# Altium PCB MonitorPCB-v1.1.PcbDoc (part 1 of 2)
Units mm, origin at the board's own origin, x right, y up, seen from the top; angles counter-clockwise.
Board outline 144.83 x 35 mm, 2 copper layers (Top Layer, Bottom Layer), stack 1.57 mm thick; 68 components, 45 nets, 203 pads, 57 vias.
Unrouted connection lines stored in the file: 41.
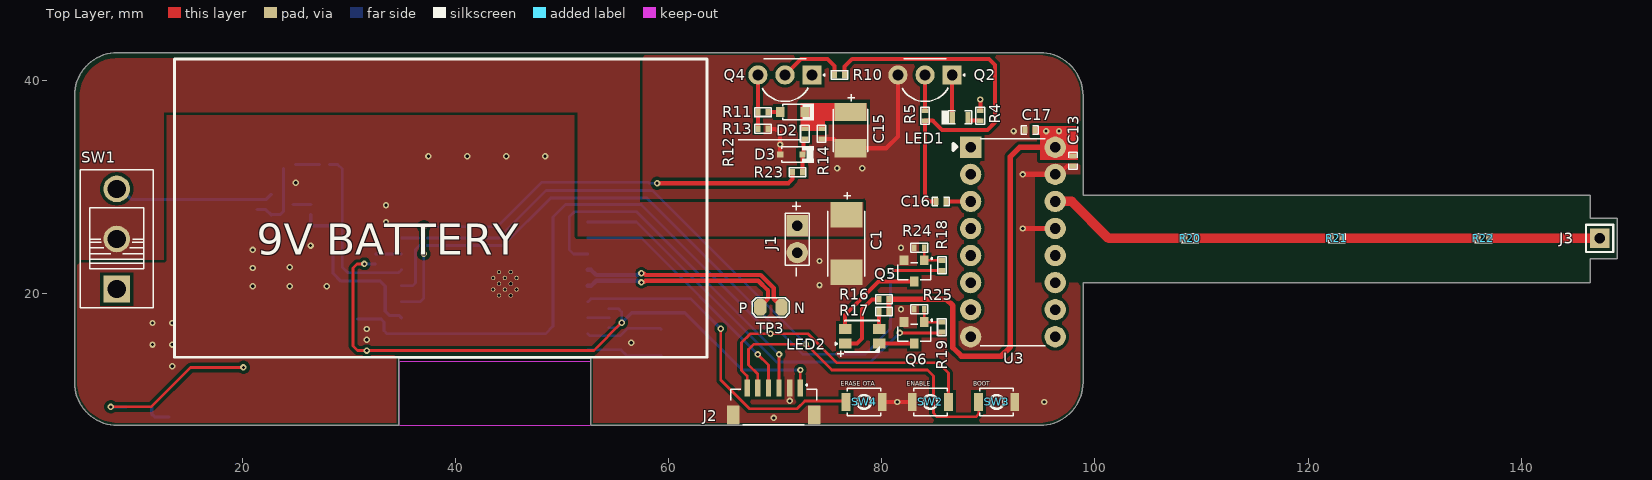
[diagram p0: Top Layer view]
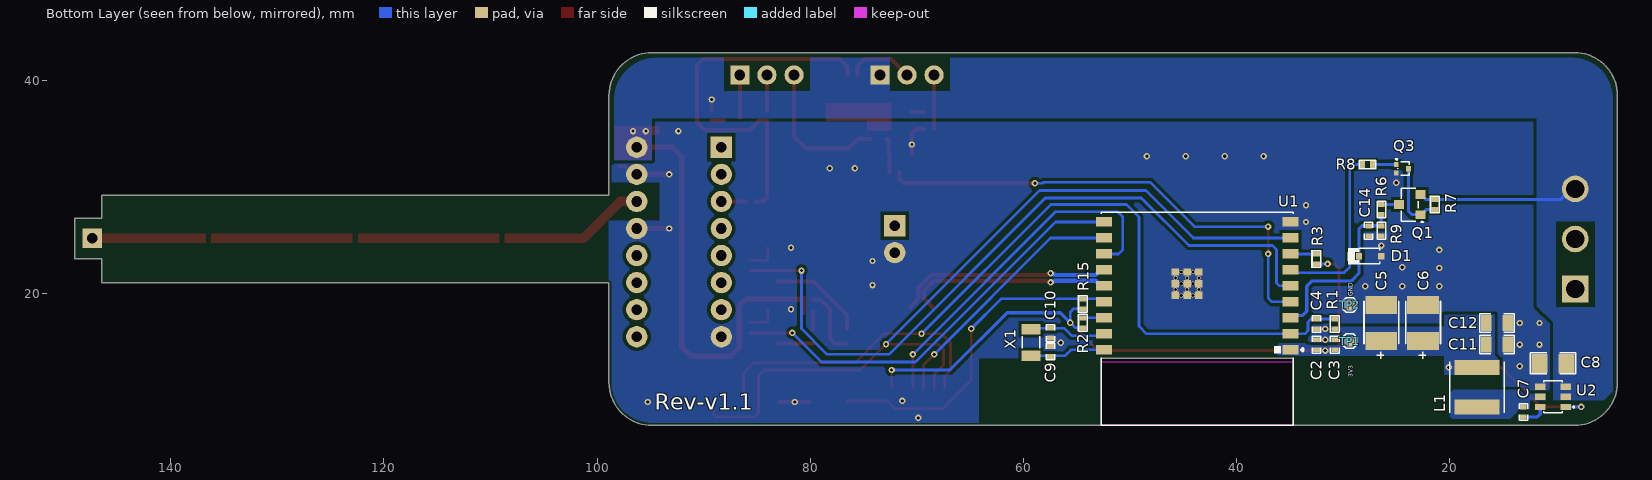
[diagram p1: Bottom Layer view, seen from below]
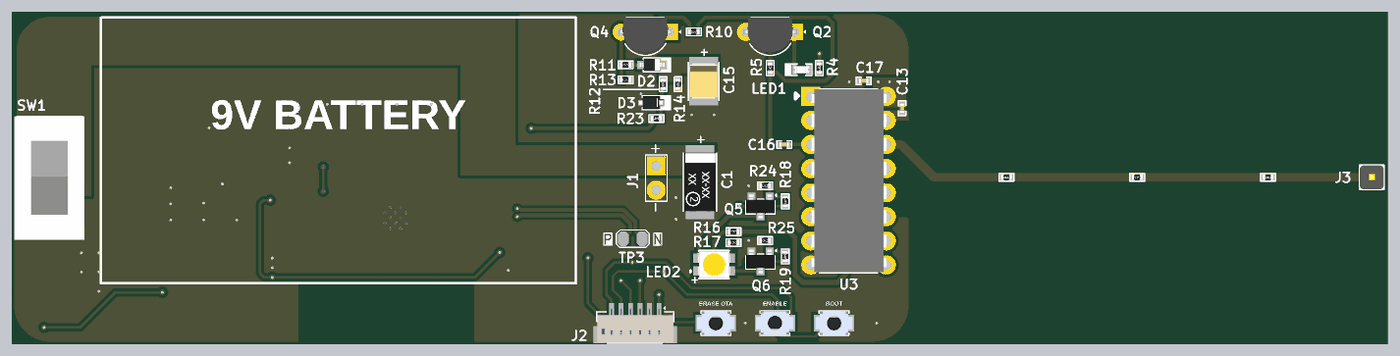
[diagram p2: 3D render of the assembled board from above, using the file's embedded part models]
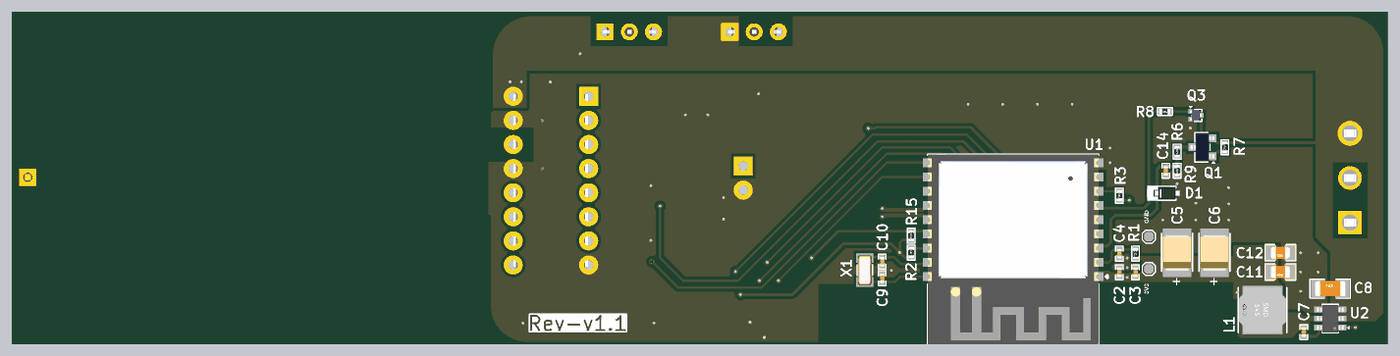
[diagram p3: 3D render of the assembled board from below, using the file's embedded part models]

## Layer stack, top to bottom
Top Solder: solder mask 0.01, Solder Resist, Dk 3.5
Top Layer: signal copper 0.035
Dielectric 1: core 1.5, FR-4, Dk 4.8
Bottom Layer: signal copper 0.035
Bottom Solder: solder mask 0.01, Solder Resist, Dk 3.5

## Board outline
8.255,7.653 34.65,7.653 34.65,13.979 52.652,13.979 52.652,7.653 94.844,7.653 ccw(c94.844,11.692) 98.882,11.692 98.882,21.027 146.507,21.027 146.507,23.313 149.047,23.313 149.047,27.123 146.507,27.123 146.507,29.282 98.882,29.282 98.882,38.617 ccw(c94.844,38.617) 94.844,42.655 8.255,42.655 ccw(c8.255,38.617) 4.216,38.617 4.216,11.692 ccw(c8.255,11.692)

## Design rules (kind name [scope] priority, off if disabled: settings)
BoardOutlineClearance [All] p1: gap=0 ignorepadtopadclearanceinfootprint=FALSE except(0.254: Poly-OutlineEdge)
Clearance Diff90R [InDifferentialPair('USB_D')] p1: gap=0.254 ignorepadtopadclearanceinfootprint=FALSE except(0.127: Arc-Arc Arc-Track Track-Track)
Clearance [All] p2: gap=0.254 ignorepadtopadclearanceinfootprint=FALSE except(0.305: Arc-Poly Track-Poly SMDPad-Poly THPad-Poly Via-Poly Fill-Poly Poly-Poly)
DiffPairsRouting [InDifferentialPair('USB_D')] p1: maxlimit=0.127 minlimit=0.127 mostfreqgap=0.127 toplayer_minwidth=0.406 toplayer_maxwidth=0.406 toplayer_prefwidth=0.406 bottomlayer_minwidth=0.406 bottomlayer_maxwidth=0.406 bottomlayer_prefwidth=0.406 impedanceprofiledriven=TRUE impedanceprofileid={3F4489F9-FEF9-4E2F-9548-F417FF496E16} impedanceprofilevalue=90.000000 maxuncoupledlength=12.7
HoleToHoleClearance [All] p1: gap=0 allowstackedmicrovias=TRUE
MinimumSolderMaskSliver [All] p1: minsoldermaskwidth=0
PolygonConnect [All] p1: connectstyle=Direct reliefconductorwidth=0.254 reliefentries=4 polygonreliefangle="90 Angle" airgapwidth=0.254
RoutingVias [All] p1: holewidth=0.3 width=0.6 viastyle="Through Hole" minholewidth=0.3 minwidth=0.6 maxholewidth=0.3 maxwidth=0.6
SilkToSilkClearance [All] p1: silktosilkclearance=0
SilkToSolderMaskClearance [IsPad] p1: minsilkscreentomaskgap=0 clearancetoexposedcopper=TRUE
SolderMaskExpansion Via [IsVia] p1: expansion=0.102 istentingtop=TRUE
Width [All] p1: maxlimit=0.9 minlimit=0.254 preferedwidth=0.254 minimp=50.000000 maximp=50.000000 favimp=50.000000
25 further rules are at their usual default settings.

## Classes and differential pairs
net class USB_LINES: USB_D_N USB_D_P
differential pair USB_D: +USB_D_P -USB_D_N

## Components (designator, comment, footprint, x,y, rotation, side; value= is the part's Value field where it differs from the comment)
C1 "68uF" Case-C 76.657,24.724 r270 top
C2 "100nF" cap-0402 32.461,15.225 r270 bottom
C3 "10uF" Cap-0402 30.759,15.225 r270 bottom
C4 "1uF" Cap-0402 32.461,17.175 r90 bottom
C5 "100uF" Case-B 26.387,17.262 r90 bottom
C6 "100uF" Case-B 22.45,17.262 r90 bottom
C7 "100nF" cap-0402 13.049,8.918 r270 bottom
C8 "10uF" Cap-1206 10.262,13.487 r180 bottom
C9 "15pF" Cap-0402 57.429,14.594 r270 bottom
C10 "15pF" Cap-0402 57.429,16.319 r90 bottom
C11 "22uF" Cap-0805 15.513,15.24 r0 bottom
C12 "22uF" Cap-0805 15.513,17.272 r0 bottom
C13 "100nF" cap-0402 97.942,32.491 r90 top
C14 "100nF" cap-0402 27.572,25.921 r90 bottom
C15 "33uF" Case-B 77.053,35.373 r270 top
C16 "100nF" cap-0402 85.534,28.681 r180 top
C17 "100nF" cap-0402 93.891,35.39 r0 top
D1 "MM3Z3V3B" SOD323F 27.428,23.546 r0 bottom
D2 "1N4148WS-7-F" SOD-323 71.624,37.073 r180 top
D3 "MM3Z3V3B" SOD323F 71.494,33.085 r0 top
J1 "BE-13-010" BE-13-010 72.06,25.142 r270 top
J2 "Voltlink Target" "Voltlink Target" 69.85,9.896 r180 top locked
J3 "DNP" "HDR 1x1 TH Male" 147.38,25.218 r0 top locked
L1 "3.9uH" SWPA5020S3R9NT 17.393,11.238 r90 bottom
LED1 "Emerald" LED-0603 87.341,36.562 r180 top
LED2 "A-SC6302R6AGHC-A03-2T" A-SC6302R6AGHC-A03-2T 78.151,16.027 r180 top
Q1 "AO3407" SOT-23 23.711,28.384 r90 bottom
Q2 "BC547BTA" TO-92-3L 84.051,40.552 r180 top locked
Q3 "MMBT3904M" SOT-723 24.413,31.754 r270 bottom
Q4 "BC547BTA" TO-92-3L 70.906,40.552 r180 top locked
Q5 "AO3400A" sot-23 83.033,22.153 r180 top
Q6 "AO3400A" sot-23 83.033,16.352 r180 top
R1 "10K" Res-0402 30.759,17.175 r270 bottom
R2 "10K" Res-0402 54.381,17.285 r270 bottom
R3 "10K" Res-0402 32.461,23.285 r270 bottom
R4 "2.2K" Res-0402 89.24,36.728 r90 top
R5 "1K" Res-0402 84.051,36.728 r90 top
R6 "47K" Res-0402 26.378,27.915 r90 bottom
R7 "1K" Res-0402 21.349,28.384 r270 bottom
R8 "4.7K" Res-0402 27.67,32.154 r180 bottom
R9 "18K" Res-0402 26.378,25.921 r90 bottom
R10 "DNP" Res-0402 76.023,40.552 r180 top
R11 "0R" Res-0402 68.836,37.073 r0 top
R12 "100K" Res-0402 72.774,35.028 r270 top
R13 "100K" Res-0402 68.836,35.498 r180 top
R14 "100K" Res-0402 74.346,35.028 r90 top
R15 "10K" Res-0402 54.381,19.063 r270 bottom
R16 "2.2K" Res-0402 80.2,19.492 r180 top
R17 "2.2K" Res-0402 80.2,18.339 r180 top
R18 "680R" Res-0402 85.649,22.683 r90 top
R19 "680R" Res-0402 85.637,16.883 r270 top
R20 "0R" Res-0402 108.928,25.218 r0 top locked
R21 "0R" Res-0402 122.695,25.218 r180 top locked
R22 "0R" Res-0402 136.462,25.218 r0 top locked
R23 "DNP" Res-0402 72.074,31.42 r180 top
R24 "10K" Res-0402 83.513,24.333 r0 top
R25 "10K" Res-0402 83.513,18.563 r0 top
SW1 "SS-12D10L9" SS-12D10L9 8.179,25.154 r90 top locked
SW2 "B3U-1000P" B3U-1000P 84.557,9.856 r180 top locked
SW3 "B3U-1000P" B3U-1000P 90.78,9.856 r0 top locked
SW4 "B3U-1000P" B3U-1000P 78.334,9.856 r0 top locked
TP1 "TEST POINT 0.5mm Dia" "Test-point - 0.5mm" 29.358,15.562 r0 bottom
TP2 "TEST POINT 0.5mm Dia" "Test-point - 0.5mm" 29.358,18.962 r0 bottom
TP3 "2 Test Pad" "2 Test Pad" 70.58,18.745 r180 top
U1 "ESP32-C3-WROOM-02-N4" ESP32-C3-WROOM-02-N4 34.9,14.755 r0 bottom
U2 "AP63203WU-7" TSOT-23-6 10.262,10.338 r0 bottom
U3 "CD4017BE(LX)" DIP-16 92.304,24.871 r0 top locked
X1 "Q13FC13500004" SMD3215-2P 59.258,15.443 r90 bottom

## Footprints (in the part's own frame and the unit in brackets; to place one, negate y for a bottom-side part, rotate by r counter-clockwise, add the part's x,y. Pads: shape width x height; smd on the part's side, far side on the other; paste and mask are expansions set on the pad)
"2 Test Pad" [mil]
  oct 45x60 smd: 1(0,0) 2(78.74,0)
  silkscreen extent -29,-36 108,36
A-SC6302R6AGHC-A03-2T [mm]
  rect 1.2x0.95 smd paste+0 mask+0.05: 1(1.6,0.675) 2(1.6,-0.675) 3(-1.6,-0.675) 4(-1.6,0.675)
  silkscreen extent -1.63,-1.48 2.51,1.93, body extent -1.75,-1.4 1.75,1.4, height 1.85
B3U-1000P [mm] "SWITCH TACTILE SPST-NO 0.05A 12V"
  rect 0.82x1.72 smd: 1(-1.7,0) 2(1.7,0)
  silkscreen extent -1.57,-1.3 1.57,1.3, body extent -2,-1.26 2,1.24, height 1.6
BE-13-010 [mm]
  rect 2x2 hole 1: 1(-1.27,0)
  round 2 hole 1: 2(1.27,0)
  silkscreen extent -3.49,-1.14 3.47,1.14
cap-0402 [mil]
  rect 18x25 smd mask+2.36: 1(-18.5,0) 2(18.5,0)
  silkscreen extent -31,-16 31,16, body extent -20,-10 20,10, height 19
Cap-0402 [mil]
  rect 18x25 smd mask+2.36: 1(-18.5,0) 2(18.5,0)
  silkscreen extent -31,-16 31,16, body extent -20,-10 20,10, height 19
Cap-0805 [mil] "SMD 0805"
  rect 40x60 smd mask+2.76: 1(-40,0) 2(40,0)
  silkscreen extent -64,-34 64,34, body extent -39,-25 39,25, height 30
Cap-1206 [mil] "SMD 1206"
  rect 60x70 smd: 1(-50,0) 2(50,0)
  silkscreen extent -84,-39 84,39, body extent -63,-31 63,32, height 39
Case-B [mm]
  rect 1.7x3 smd paste+0: 1(-1.7,0) 2(1.7,0)
  silkscreen extent -3.35,-1.63 2.03,1.63, body extent -1.85,-1.5 1.85,1.5, height 2.16
Case-C [mm]
  rect 2.4x3 smd: 1(-2.7,0) 2(2.7,0)
  silkscreen extent -4.8,-1.75 3.05,1.75, body extent -3.1,-1.67 3.1,1.68, height 2.46
DIP-16 [mm]
  rect 2x2 hole 1: 1(-3.97,8.89)
  round 2 hole 1: 2(-3.97,6.35) 3(-3.97,3.81) 4(-3.97,1.27) 5(-3.97,-1.27) 6(-3.97,-3.81) 7(-3.97,-6.35) 8(-3.97,-8.89) 9(3.97,-8.89) 10(3.97,-6.35) 11(3.97,-3.81) 12(3.97,-1.27) 13(3.97,1.27) 14(3.97,3.81) 15(3.97,6.35) 16(3.97,8.89)
  silkscreen extent -5.6,-9.73 3.05,9.68, body extent -3.91,-9.65 3.99,9.65, height 5.08
ESP32-C3-WROOM-02-N4 [mm]
  rect 1.5x0.9 smd: 1(0,0) 2(0,-1.5) 3(0,-3) 4(0,-4.5) 5(0,-6) 6(0,-7.5) 7(0,-9) 8(0,-10.5) 9(0,-12) 10(17.5,-12) 11(17.5,-10.5) 12(17.5,-9) 13(17.5,-7.5) 14(17.5,-6) 15(17.5,-4.5) 16(17.5,-3) 17(17.5,-1.5) 18(17.5,0)
  rect 0.7x0.7 smd: 19(8.61,-5.1) 20(9.71,-5.1) 21(10.81,-5.1) 22(8.61,-6.2) 23(9.71,-6.2) 24(10.81,-6.2) 25(8.61,-7.3) 26(9.71,-7.3) 27(10.81,-7.3)
  round 0.4 hole 0.3 mask+0: 28(9.16,-5.1) 29(10.26,-5.1) 30(8.61,-5.65) 31(9.71,-5.65) 32(10.81,-5.65) 33(9.16,-6.2) 34(10.26,-6.2) 35(8.61,-6.75) 36(9.71,-6.75) 37(10.81,-6.75) 38(9.16,-7.3) 39(10.26,-7.3)
  Keep-Out Layer region: 17.75,1.1 -0.25,1.1 -0.25,7.1 17.75,7.1
  silkscreen extent -1.17,-12.9 17.75,7.1, body extent -0.25,-12.9 17.75,7.1, height 3.35
"HDR 1x1 TH Male" [mm]
  rect 1.8x1.8 hole 1: 1(0,0)
  silkscreen extent -1.27,-1.27 1.27,1.27, body extent -1.27,-1.27 1.28,1.27, height 8.5
LED-0603 [mm]
  rect 0.5x1 smd: 1(-0.75,0) 2(0.75,0)
  silkscreen extent -1.12,-0.66 1.75,0.66, body extent -0.82,-0.37 0.82,0.36, height 0.68
Res-0402 [mil]
  rect 18x25 smd mask+2.17: 1(-18.5,0) 2(18.5,0)
  silkscreen extent -32,-17 32,16, body extent -23,-11 23,11, height 16
SMD3215-2P [mm]
  rect 1x1.8 smd: 1(-1.25,0) 2(1.25,0)
  silkscreen extent -0.56,-0.81 0.56,0.81, body extent -1.6,-0.75 1.6,0.75, height 0.8
SOD323F [mm]
  rect 0.6x0.6 smd: 1(-1.05,0) 2(1.05,0)
  silkscreen extent -0.91,-0.79 2.11,0.79, body extent -1.25,-0.67 1.25,0.68, height 1
SOD-323 [mm]
  rect 0.8x0.9 smd mask+0.055: 1(-1.15,0) 2(1.15,0)
  silkscreen extent -2.01,-0.79 0.94,0.79, body extent -1.3,-0.67 1.3,0.67, height 1.1
SOT-23 [mm] "TRANS NPN 40V 0.6A SOT23"
  rect 0.82x0.92 smd: 1(-0.95,-1) 2(0.95,-1) 3(0,1)
  silkscreen extent -1.68,-1.3 1.55,0.81, body extent -1.5,-1.25 1.5,1.25, height 1.05
sot-23 [mm] "TRANS NPN 40V 0.6A SOT23"
  rect 0.82x0.92 smd: 1(-0.95,-1) 2(0.95,-1) 3(0,1)
  silkscreen extent -1.68,-1.3 1.55,0.81, body extent -1.5,-1.25 1.5,1.25, height 1.05
SOT-723 [mm]
  rect 0.5x0.45 smd: 1(-0.4,-0.575) 2(0.4,-0.575) 3(0,0.575)
  silkscreen extent -0.94,-0.66 0.64,0.64, body extent -0.6,-0.6 0.6,0.6, height 0.5
SS-12D10L9 [mm]
  rect 2.5x2.5 hole 1.7 paste-2539.97 mask+0.051: 1(-4.7,0)
  round 2.5 hole 1.7 paste-2539.97 mask+0.051: 2(0,0) 3(4.7,0)
  silkscreen extent -6.48,-3.43 6.48,3.43, body extent -6.5,-3.7 6.5,3.7, height 16
SWPA5020S3R9NT [mm]
  rect 1.4x4.2 smd: 1(-1.85,0) 2(1.85,0)
  silkscreen extent -2.4,-2.55 2.38,2.55, body extent -2.51,-2.5 2.51,2.5, height 2.12
"Test-point - 0.5mm" [mm]
  oct 1x1 smd: 1(0,0)
  silkscreen extent -0.68,-0.68 0.68,0.68
TO-92-3L [mm]
  rect 1.8x1.8 hole 1 paste-2539.97 mask+0.051: 1(-2.54,0)
  round 1.8 hole 1 paste-2539.97 mask+0.051: 2(0,0) 3(2.54,0)
  silkscreen extent -3.71,-1.5 2.14,2.48, body extent -2.77,-1.5 2.77,2.2, height 7.79
TSOT-23-6 [mm]
  rect 1x0.6 smd: 1(-1.2,0.95) 2(-1.2,0) 3(-1.2,-0.95) 4(1.2,-0.95) 5(1.2,0) 6(1.2,0.95)
  silkscreen extent -1.98,-1.5 0.86,1.5, body extent -1.41,-1.45 1.41,1.45, height 1
"Voltlink Target" [mm]
  rect 0.5x1.6 smd: 1(-2.5,-1.262) 2(-1.5,-1.262) 3(-0.5,-1.262) 4(0.5,-1.262) 5(1.5,-1.262) 6(2.5,-1.262)
  rect 1.2x1.8 smd: MP1(-3.8,1.262) MP2(3.8,1.262)
  silkscreen extent -4.06,-1.68 4.06,2.17, body extent -4,-1.49 4,2.11, height 4.25

## Part data
C1: library part TAJC686K016RNJ, "CAP TANT 68UF 10% 16V 2312", Case Code (Imperial)=2312, Case Code (Metric)=6032, Case/Package=Molded, Dielectric Material=Tantalum, ESR (Equivalent Series Resistance)=1.3R, LCSC Part Number=C7220, Leakage Current=10.9uA, Manufacturer="Kyocera AVX", Max Operating Temperature=125°C, Min Operating Temperature=-55°C, Package Quantity=1, Tolerance=10%, Voltage=16V, Voltage Rating (DC)=16.3V, ComponentLink1Description=https://datasheet.ciiva.com/11794/0900766b802e69d0-11794413.pdf?src-supplier=Rs, ComponentLink1URL=https://datasheet.ciiva.com/11794/0900766b802e69d0-11794413.pdf?src-supplier=Rs, ComponentLink2Description=https://datasheet.ciiva.com/7864/1680476-7864538.pdf?src-supplier=Element14, ComponentLink2URL=https://datasheet.ciiva.com/7864/1680476-7864538.pdf?src-supplier=Element14, ComponentLink3Description=https://datasheet.ciiva.com/7864/1680476-7864539.pdf?src-supplier=Element14, ComponentLink3URL=https://datasheet.ciiva.com/7864/1680476-7864539.pdf?src-supplier=Element14, ComponentLink4Description=https://datasheet.ciiva.com/7864/1680476-7864537.pdf?src-supplier=Element14, ComponentLink4URL=https://datasheet.ciiva.com/7864/1680476-7864537.pdf?src-supplier=Element14, ComponentLink5Description=https://datasheet.ciiva.com/28577/taj-28577855.pdf?src-supplier=Element14, ComponentLink5URL=https://datasheet.ciiva.com/28577/taj-28577855.pdf?src-supplier=Element14, ComponentLink6Description=https://datasheet.ciiva.com/264/taj-264443.pdf?src-supplier=Digikey, ComponentLink6URL=https://datasheet.ciiva.com/264/taj-264443.pdf?src-supplier=Digikey, ComponentLink7Description=https://datasheet.ciiva.com/264/taj-264442.pdf?src-supplier=Digikey, ComponentLink7URL=https://datasheet.ciiva.com/264/taj-264442.pdf?src-supplier=Digikey, ComponentLink8Description=https://datasheet.ciiva.com/264/taj-264444.pdf?src-supplier=Digikey, ComponentLink8URL=https://datasheet.ciiva.com/264/taj-264444.pdf?src-supplier=Digikey, ComponentLink9Description=https://datasheet.ciiva.com/12883/taj-27497-12883640.pdf?src-supplier=Mouser, ComponentLink9URL=https://datasheet.ciiva.com/12883/taj-27497-12883640.pdf?src-supplier=Mouser, ComponentLink10Description=https://datasheet.ciiva.com/11225/taj-11225965.pdf?src-supplier=Avnet, ComponentLink10URL=https://datasheet.ciiva.com/11225/taj-11225965.pdf?src-supplier=Avnet, ComponentLink11Description=https://datasheet.ciiva.com/16298/taj-16298458.pdf?src-supplier=Future+Electronics, ComponentLink11URL=https://datasheet.ciiva.com/16298/taj-16298458.pdf?src-supplier=Future+Electronics, ComponentLink12Description=https://datasheet.ciiva.com/15163/getdatasheetpartid-41779-15163003.pdf?src-supplier=Verical, ComponentLink12URL=https://datasheet.ciiva.com/15163/getdatasheetpartid-41779-15163003.pdf?src-supplier=Verical, Depth=3.2mm, Dissipation Factor=6%, Features="General Purpose", Height=2.6mm, Height - Seated (Max)=0.11inch, Item Type=Capacitors, Lead Free="Lead Free", Length=6mm, Manufacturer Part Number=TAJC686K016RNJ, Mounting Technology="Surface Mount", Packaging="Tape and Reel", Pins=2, Polarity=Polar, Pricing="1=1.06, 10=0.729, 50=0.581, 100=0.5317 (USD)", Radiation Hardening=No, Reach SVHC Compliant=No, RoHS=Yes, RoHS Compliant=Yes, Series=TAJ, Stock=888, Supplier=Digikey, Termination=SMD/SMT, Voltage Rating=16V, Width=3.2mm
C2 C7 C13 C14 C16 C17: library part C1005X7R1H104KT000F, "CAP CER 0.1UF 50V X7R 0402", Dielectric=X7R, LCSC Part Number=C361198, Manufacturer=TDK, Tolerance=10%, Voltage=25V, Category="Ceramic Capacitors", ComponentLink1Description=LCSC, ComponentLink1URL=https://www.lcsc.com/product-detail/Multilayer-Ceramic-Capacitors-MLCC-SMD-SMT_TDK-C1005X7R1H104KT000F_C361198.html, Item Type=Capacitor, Manufacturer Part Number=C1005X7R1H104KT000F, RoHS=No, Supplier 1=Avnet, Supplier Part Number 1=C1005X7R1H104KT000F
C3: library part CC0402MRX5R6BB106, "CAP CER 10UF 10V X5R 0402", Case Code (Imperial)=0402, Case Code (Metric)=1005, LCSC Part Number=C962143, Manufacturer=Yageo, Max Operating Temperature=85°C, Min Operating Temperature=-55°C, Supplier Part Number 1=6097631, Tolerance=20%, Voltage Rating=10V, Capacitance=10uF, Case/Package=0402, Category="Ceramic Capacitors", ComponentLink1Description=http://www.yageo.com/documents/recent/UPY-GPHC_X5R_4V-to-50V_25.pdf?src-supplier=Digi-Key, ComponentLink1URL=http://www.yageo.com/documents/recent/UPY-GPHC_X5R_4V-to-50V_25.pdf?src-supplier=Digi-Key, Item Type=Capacitor, Manufacturer Part Number=CC0402MRX5R6BB106, Mount="Surface Mount", Packaging="Tape and Reel", Pricing 1="10000=0.02650, 20000=0.02590, 30000=0.02550, 40000=0.02530, 50000=0.02450 (USD)", RoHS=Yes, RoHS Compliant=Yes, Stock 1=80000, Supplier 1="Future Electronics"
C4: library part CC0402KRX5R7BB105, "CAP CER 1UF 16V X5R 0402", Case Code (Imperial)=0402, Case Code (Metric)=1005, Dielectric=X5R, LCSC Part Number=C325464, Manufacturer=Yageo, Max Operating Temperature=85°C, Min Operating Temperature=-55°C, Supplier Part Number 1=311-1691-6-ND, Tolerance=10%, Voltage Rating=16V, Capacitance=1uF, Case/Package=0402, ComponentLink1Description=http://www.yageo.com/documents/recent/UPY-GPHC_X5R_4V-to-50V_12.pdf?src-supplier=Avnet+Europe, ComponentLink1URL=http://www.yageo.com/documents/recent/UPY-GPHC_X5R_4V-to-50V_12.pdf?src-supplier=Avnet+Europe, Composition=Ceramic, Depth=0.5mm, Halogen Free="Halogen Free", Height=0.5mm, Item Type=Capacitor, Lead Free="Lead Free", Length=1mm, Manufacturer Part Number=CC0402KRX5R7BB105, Mount="Surface Mount", Packaging="Tape and Reel", Pricing 1="1=0.36, 10=0.252, 100=0.1512, 500=0.1134, 1000=0.09576, 2500=0.09072, 5000=0.08568 (USD)", Radiation Hardening=No, Stock 1=1405667, Supplier 1=Digi-Key, Termination=SMD/SMT, Thickness=0.022inch, Voltage Rating (DC)=16V, Weight=2.3E-05oz, Width=0.02inch
C5 C6: library part TPSB107M006R0250, "CAP TANT 100UF 20% 6.3V 1411", LCSC Part Number=C283239, Manufacturer="Kyocera AVX", ComponentLink1Description=https://datasheet.ciiva.com/16501/tps-16501597.pdf?src-supplier=Future+Electronics, ComponentLink1URL=https://datasheet.ciiva.com/16501/tps-16501597.pdf?src-supplier=Future+Electronics, ComponentLink2Description=https://datasheet.ciiva.com/3004/tps-3004598.pdf?src-supplier=Avnet, ComponentLink2URL=https://datasheet.ciiva.com/3004/tps-3004598.pdf?src-supplier=Avnet, ComponentLink3Description=https://datasheet.ciiva.com/264/tps-264115.pdf?src-supplier=Digikey, ComponentLink3URL=https://datasheet.ciiva.com/264/tps-264115.pdf?src-supplier=Digikey, ComponentLink4Description=https://datasheet.ciiva.com/264/tps-264116.pdf?src-supplier=Digikey, ComponentLink4URL=https://datasheet.ciiva.com/264/tps-264116.pdf?src-supplier=Digikey, ComponentLink5Description=https://datasheet.ciiva.com/264/tps-264117.pdf?src-supplier=Digikey, ComponentLink5URL=https://datasheet.ciiva.com/264/tps-264117.pdf?src-supplier=Digikey, Item Type="Tantalum Capacitors", Manufacturer Part Number=TPSB107M006R0250, Pricing="1=0.8, 10=0.504, 50=0.3874, 100=0.3515, 500=0.29072, 1000=0.27195 (USD)", RoHS=Yes, Stock=19045, Supplier=Digikey
C8: library part CC1206KKX7R7BB106, "CAP CER 10UF 16V X7R 1206", LCSC Part Number=C109464, Manufacturer=Yageo, ComponentLink1Description=https://datasheet.ciiva.com/46392/1489800-46392365.pdf?src-supplier=Element14, ComponentLink1URL=https://datasheet.ciiva.com/46392/1489800-46392365.pdf?src-supplier=Element14, ComponentLink2Description=https://datasheet.ciiva.com/11466/upy-gphc-x7r-6-3v-to-50v-8-11466571.pdf?src-supplier=Avnet, ComponentLink2URL=https://datasheet.ciiva.com/11466/upy-gphc-x7r-6-3v-to-50v-8-11466571.pdf?src-supplier=Avnet, Halogen Free=5694HalogenFree, Item Type=Capacitors, Lead Free=5697LeadFree, Manufacturer Part Number=CC1206KKX7R7BB106, Pricing="2000=0.192, 4000=0.188, 6000=0.186, 8000=0.184, 10000=0.179 (USD)", RoHS=Yes, Stock=104000, Supplier="Future Electronics"
C9 C10: library part CQ0402GRNPO9BN150, "CAP CER 15PF 50V C0G/NPO 0402", Case Code (Imperial)=0402, Case Code (Metric)=1005, Dielectric=C0G, LCSC Part Number=C577406, Manufacturer=Yageo, Max Operating Temperature=125°C, Min Operating Temperature=-55°C, Package Quantity=10000, Tolerance=2%, Voltage Rating=50V, Case/Package=0402, ComponentLink1Description=http://www.mouser.com/ds/2/447/UPY-High%20Q_NP0_16V-to-250V_11-533944.pdf?src-supplier=Mouser, ComponentLink1URL=http://www.mouser.com/ds/2/447/UPY-High%20Q_NP0_16V-to-250V_11-533944.pdf?src-supplier=Mouser, ComponentLink2Description=http://www.yageo.com/documents/recent/UPY-High%20Q_NP0_16V-to-250V_13.pdf?src-supplier=Digikey, ComponentLink2URL=http://www.yageo.com/documents/recent/UPY-High%20Q_NP0_16V-to-250V_13.pdf?src-supplier=Digikey, Item Type=Capacitors, Manufacturer Part Number=CQ0402GRNPO9BN150, Mounting Technology="Surface Mount", Packaging="Tape and Reel", Pricing="10000=0.04366 (USD)", RoHS=Yes, Series=CQ, Supplier=Digikey, Voltage Rating (DC)=50V, Weight=2.3E-05oz
C11 C12: library part GRM21BZ70J226ME44L, "CAP CER 22UF 6.3V X7R 0805", Case/Package=339Case, LCSC Part Number=C1517827, Manufacturer=Murata, Max Operating Temperature=125°C, Min Operating Temperature=-55°C, Tolerance=20%, Voltage Rating=6.3V, Height=1.45mm, Item Type=Capacitors, Length=2mm, Manufacturer Part Number=GRM21BZ70J226ME44L, Material=4241ConductorMaterial, Pricing="1=0.41, 10=0.243, 50=0.243, 100=0.154, 1000=0.108, 10000=0.082 (USD)", RoHS=Yes, RoHS Compliant=Yes, Stock=88243, Supplier=Mouser, Thickness=1.25mm, Width=1.25mm
C15: library part TAJB336K010RNJ, "CAP TANT 33UF 10% 10V 1411", Case Code (Imperial)=1210, Case Code (Metric)=3528, Dielectric Material=Tantalum, ESR (Equivalent Series Resistance)=1.8R, LCSC Part Number=C7202, Leakage Current=3.3uA, Manufacturer="Kyocera AVX", Max Operating Temperature=125°C, Min Operating Temperature=-55°C, Package Quantity=1, Supplier Part Number 1=1364604P, Tolerance=10%, Voltage=10V, Case/Package=1210, Category="Tantalum Capacitors", ComponentLink1Description=https://datasheet.ciiva.com/26341/559435-da-01-en-tacc-b-3-2-mm-x-2-5-mm-x-1-9-mm-33-uf-26341776.pdf?src-supplier=Conrad, ComponentLink1URL=https://datasheet.ciiva.com/26341/559435-da-01-en-tacc-b-3-2-mm-x-2-5-mm-x-1-9-mm-33-uf-26341776.pdf?src-supplier=Conrad, ComponentLink2Description=https://datasheet.ciiva.com/7775/49917-7775706.pdf?src-supplier=Element14, ComponentLink2URL=https://datasheet.ciiva.com/7775/49917-7775706.pdf?src-supplier=Element14, ComponentLink3Description=https://datasheet.ciiva.com/7775/49917-7775705.pdf?src-supplier=Element14, ComponentLink3URL=https://datasheet.ciiva.com/7775/49917-7775705.pdf?src-supplier=Element14, ComponentLink4Description=https://datasheet.ciiva.com/7775/1680476-7775704.pdf?src-supplier=Element14, ComponentLink4URL=https://datasheet.ciiva.com/7775/1680476-7775704.pdf?src-supplier=Element14, ComponentLink5Description=https://datasheet.ciiva.com/264/taj-264134.pdf?src-supplier=Digi-Key, ComponentLink5URL=https://datasheet.ciiva.com/264/taj-264134.pdf?src-supplier=Digi-Key, ComponentLink6Description=https://datasheet.ciiva.com/264/taj-264133.pdf?src-supplier=Digi-Key, ComponentLink6URL=https://datasheet.ciiva.com/264/taj-264133.pdf?src-supplier=Digi-Key, ComponentLink7Description=https://datasheet.ciiva.com/264/taj-264135.pdf?src-supplier=Digi-Key, ComponentLink7URL=https://datasheet.ciiva.com/264/taj-264135.pdf?src-supplier=Digi-Key, ComponentLink8Description=https://datasheet.ciiva.com/12884/taj-27497-12884279.pdf?src-supplier=Mouser, ComponentLink8URL=https://datasheet.ciiva.com/12884/taj-27497-12884279.pdf?src-supplier=Mouser, ComponentLink9Description=https://datasheet.ciiva.com/14590/70001050-14590215.pdf?src-supplier=Allied+Electronics, ComponentLink9URL=https://datasheet.ciiva.com/14590/70001050-14590215.pdf?src-supplier=Allied+Electronics, ComponentLink10Description=https://datasheet.ciiva.com/14592/70001050-14592670.pdf?src-supplier=Allied+Electronics, ComponentLink10URL=https://datasheet.ciiva.com/14592/70001050-14592670.pdf?src-supplier=Allied+Electronics, ComponentLink11Description=https://datasheet.ciiva.com/11224/taj-11224937.pdf?src-supplier=Avnet, ComponentLink11URL=https://datasheet.ciiva.com/11224/taj-11224937.pdf?src-supplier=Avnet, ComponentLink12Description=https://datasheet.ciiva.com/16492/taj-16492863.pdf?src-supplier=Future+Electronics, ComponentLink12URL=https://datasheet.ciiva.com/16492/taj-16492863.pdf?src-supplier=Future+Electronics, ComponentLink13Description=https://datasheet.ciiva.com/11224/taj-11224941.pdf?src-supplier=Avnet, ComponentLink13URL=https://datasheet.ciiva.com/11224/taj-11224941.pdf?src-supplier=Avnet, Construction=Flat, Depth=2.8mm, Dissipation Factor=6%, Features="General Purpose", Height=1.9mm, Height - Seated (Max)=0.083inch, Item Type=Capacitor, Lead Free="Lead Free", Lead Pitch=1.4mm, Length=3.5mm, Manufacturer Part Number=TAJB336K010RNJ, Mounting Technology="Surface Mount,PCB", Packaging="Tape and Reel", Pins=2, Polarity=Polar, Pricing 1="100=0.01410, 400=0.24800, 1000=0.21600 (GBP)", Radiation Hardening=No, Reach SVHC Compliant=Yes, RoHS=Yes, RoHS Compliant=Yes, Series=TAJ, Stock 1=1580, Supplier 1=Rs, Termination=SMD/SMT, Voltage Rating=10V, Voltage Rating (DC)=10V, Width=2.8mm
D1 D3: "DIODE ZENER 3.3V 200MW SOD323F", Forward Voltage=1V, LCSC Part Number=C2978865, Manufacturer="ON Semiconductor / Fairchild", Max Operating Temperature=150°C, Max Power Dissipation=200mW, Max Reverse Leakage Current=4.5uA, Min Operating Temperature=-65°C, Package Quantity=1, Supplier Part Number 1=MM3Z3V3BCT-ND, Test Current=5mA, Tolerance=2%, Working Voltage=3.3V, ComponentLink1Description=http://www.onsemi.com/pub/Collateral/MM3Z9V1B-D.pdf?src-supplier=Digi-Key, ComponentLink1URL=http://www.onsemi.com/pub/Collateral/MM3Z9V1B-D.pdf?src-supplier=Digi-Key, ComponentLink2Description=http://www.mouser.com/ds/2/149/MM3Z3V3B-187166.pdf?src-supplier=Mouser, ComponentLink2URL=http://www.mouser.com/ds/2/149/MM3Z3V3B-187166.pdf?src-supplier=Mouser, ComponentLink3Description=https://www.fairchildsemi.com/datasheets/MM/MM3Z9V1B.pdf?src-supplier=Avnet, ComponentLink3URL=https://www.fairchildsemi.com/datasheets/MM/MM3Z9V1B.pdf?src-supplier=Avnet, ComponentLink4Description=http://www.farnell.com/datasheets/1706525.pdf?src-supplier=Element14, ComponentLink4URL=http://www.farnell.com/datasheets/1706525.pdf?src-supplier=Element14, Element Configuration=Single, Height=1mm, Impedance=89R, Item Type=Diode, Lead Free="Lead Free", Length=1.3mm, Manufacturer Part Number=MM3Z3V3B, Mount="Surface Mount", Number of Pins=2, Packaging="Tape and Reel", Peak Reverse Current=4.5uA, Power Dissipation=200mW, Pricing 1="1=0.22, 10=0.18, 100=0.0956, 500=0.06288, 1000=0.04276 (USD)", Radiation Hardening=No, REACH SVHC="No SVHC", Stock 1=473644, Supplier 1=Digi-Key, Voltage Tolerance=2%, Weight=0.0276g, Width=1.7mm, Zener Voltage=3.3V
D2: "DIODE GEN PURP 75V 150MA SOD323", Average Rectified Current=150mA, Capacitance=2pF, Forward Current=300mA, Forward Voltage=1.25V, LCSC Part Number=C60580, Manufacturer=Diodes, Max Forward Surge Current (Ifsm)=2A, Max Operating Temperature=150°C, Max Repetitive Reverse Voltage (Vrrm)=75V, Max Reverse Current=1uA, Min Operating Temperature=-65°C, Package Quantity=3000, Power Dissipation=200mW, Supplier Part Number 1=621-1N4148WS-F, Category="Rectifier Diodes", ComponentLink1Description=https://datasheet.ciiva.com/1179/ds30097-1179355.pdf?src-supplier=Element14, ComponentLink1URL=https://datasheet.ciiva.com/1179/ds30097-1179355.pdf?src-supplier=Element14, ComponentLink2Description=https://datasheet.ciiva.com/8300/ds30097-8300396.pdf?src-supplier=Avnet, ComponentLink2URL=https://datasheet.ciiva.com/8300/ds30097-8300396.pdf?src-supplier=Avnet, ComponentLink3Description=https://datasheet.ciiva.com/16199/ds30097-16199061.pdf?src-supplier=Future+Electronics, ComponentLink3URL=https://datasheet.ciiva.com/16199/ds30097-16199061.pdf?src-supplier=Future+Electronics, ComponentLink4Description=https://datasheet.ciiva.com/911/ds30097-911742.pdf?src-supplier=Digi-Key, ComponentLink4URL=https://datasheet.ciiva.com/911/ds30097-911742.pdf?src-supplier=Digi-Key, ComponentLink5Description=https://datasheet.ciiva.com/911/ds30097-911743.pdf?src-supplier=Digi-Key, ComponentLink5URL=https://datasheet.ciiva.com/911/ds30097-911743.pdf?src-supplier=Digi-Key, ComponentLink6Description=https://datasheet.ciiva.com/911/ds30097-911741.pdf?src-supplier=Digi-Key, ComponentLink6URL=https://datasheet.ciiva.com/911/ds30097-911741.pdf?src-supplier=Digi-Key, Contact Plating=Tin,Matte, Current Rating=150mA, Element Configuration=Single, Height=1mm, Item Type=Diode, Lead Free="Lead Free", Length=1.8mm, Manufacturer Part Number=1N4148WS-7-F, Max Reverse Voltage (DC)=75V, Max Surge Current=2A, Mount="Surface Mount", Number of Pins=2, Output Current=150mA, Packaging="Tape and Reel", Peak Non-Repetitive Surge Current=2A, Polarity=Standard, Power Rating=200mW, Pricing 1="1=0.19000, 10=0.17500, 50=0.17500, 100=0.09600, 500=0.05900, 1000=0.04000, 3000=0.03000, 9000=0.02600, 10000=0.02600, 24000=0.02300, 45000=0.01900 (USD)", Radiation Hardening=No, REACH SVHC="No SVHC", Recovery Time=4ns, Reverse Recovery Time=4ns, Reverse Recovery Time-Max=4ns, RoHS=Yes, RoHS Compliant=Yes, Series=-, Supplier 1=Mouser, Voltage=75V, Voltage Rating (DC)=75V, Weight=0.000173oz, Width=1.4mm
J1: "Battery Clip Nickel Copper 9V Stacked Battery Button And Strip Battery Connector ROHS", LCSC Part Number=C19184112, Manufacturer=MYOUNG, ComponentLink1Description=LCSC, ComponentLink1URL=https://lcsc.com/product-detail/Button-And-Strip-Battery-Connector_MYOUNG-BE-13-010_C19184112.html?s_z=n_battery%2520holder, Item Type="Battery Connector", Manufacturer Part Number=BE-13-010
J2: library part C145963, "1x6P SH 1 1mm 6 SMD,P=1mm Wire To Board / Wire To Wire Connector ROHS", Manufacturer=BOOMELE, Package=SMD,P=1mm, ComponentLink1Description=LCSC, ComponentLink1URL=https://www.lcsc.com/product-detail/Wire-To-Board-Wire-To-Wire-Connector_BOOMELE-Boom-Precision-Elec-C145963_C145963.html, Item Type=Connector, LCSC Part Number=C145963, Manufacturer Part Number=C145963
J3: library part X6511WV-01H-C60D30, "Gold 250V 3A Square Pins 2.5mm 1P 260℃ 6mm -40℃~+105℃ 3mm 2.54mm Brass Black Plugin 2.54mm 1x1P Plugin,P=2.54mm Pin Headers ROHS", LCSC Part Number=C5242194, Manufacturer=XKB, Package=Plugin,P=2.54mm, ComponentLink1Description=LCSC, ComponentLink1URL=https://www.lcsc.com/product-detail/Pin-Headers_XKB-Connection-X6511WV-01H-C60D30_C5242194.html, Item Type="Male Header", Manufacturer Part Number=X6511WV-01H-C60D30
L1: library part SWPA5020S3R9NT, "FIXED IND 3.9UH 2.5A 56MOHM SMD", LCSC Part Number=C115009, Manufacturer=Sunlord, Supplier Part Number=3442-SWPA5020S3R9NTTR-ND, Category="Fixed Inductors", Item Type=Inductor, Manufacturer Part Number=SWPA5020S3R9NT, Pricing="2500=0.21917 (USD)", RoHS=No, Supplier=Digi-Key
LED1: library part NCD0603G2, "Emerald 0603 Light Emitting Diodes (LED) ROHS", LCSC Part Number=C87326, Manufacturer="Foshan NationStar Optoelectronics", Package=0603, ComponentLink1Description=LCSC, ComponentLink1URL=https://www.lcsc.com/product-detail/Light-Emitting-Diodes-LED_Foshan-NationStar-Optoelectronics-NCD0603G2_C87326.html, Item Type=LED, Manufacturer Part Number=NCD0603G2
LED2: "Colorless transparent lens -40℃~+85℃ Positive Stick Red,Green 120° SMD-4P,3.5x2.8mm LED Indication - Discrete ROHS", LCSC Part Number=C5355456, Manufacturer=Amicc, Package=SMD-4P,3.5x2.8mm, ComponentLink1Description=LCSC, ComponentLink1URL=https://jlcpcb.com/partdetail/Amicc-A_SC6302R6AGHC_A032T/C5355456, Item Type=LED, Manufacturer Part Number=A-SC6302R6AGHC-A03-2T
Q1: "30V 4.1A 60mΩ@10V,4.1A 350mW 3V@250uA P Channel SOT-23 MOSFETs ROHS", LCSC Part Number=C181093, Manufacturer="Guangdong Hottech", Package=SOT-23, ComponentLink1Description=LCSC, ComponentLink1URL=https://www.lcsc.com/product-detail/MOSFETs_Guangdong-Hottech-AO3407_C181093.html, Item Type=Mosfet, Manufacturer Part Number=AO3407
Q2 Q4: "TRANS NPN 45V 0.1A TO92-3", LCSC Part Number=C258144, Manufacturer="ON Semiconductor / Fairchild", Supplier Part Number=4008015, ComponentLink1Description=https://datasheet.ciiva.com/5770/bc546-5770589.pdf?src-supplier=Farnell, ComponentLink1URL=https://datasheet.ciiva.com/5770/bc546-5770589.pdf?src-supplier=Farnell, ComponentLink2Description=https://datasheet.ciiva.com/971/bc546-971924.pdf?src-supplier=Digikey, ComponentLink2URL=https://datasheet.ciiva.com/971/bc546-971924.pdf?src-supplier=Digikey, ComponentLink3Description=https://datasheet.ciiva.com/971/bc546-971925.pdf?src-supplier=Digikey, ComponentLink3URL=https://datasheet.ciiva.com/971/bc546-971925.pdf?src-supplier=Digikey, ComponentLink4Description=https://datasheet.ciiva.com/11197/bc550-11197771.pdf?src-supplier=Avnet, ComponentLink4URL=https://datasheet.ciiva.com/11197/bc550-11197771.pdf?src-supplier=Avnet, ComponentLink5Description=https://datasheet.ciiva.com/4722/bc547-4722169.pdf?src-supplier=Mouser, ComponentLink5URL=https://datasheet.ciiva.com/4722/bc547-4722169.pdf?src-supplier=Mouser, ComponentLink6Description=https://datasheet.ciiva.com/1195/1868820-1195467.pdf?src-supplier=Element14, ComponentLink6URL=https://datasheet.ciiva.com/1195/1868820-1195467.pdf?src-supplier=Element14, ComponentLink7Description=https://datasheet.ciiva.com/1195/1868820-1195468.pdf?src-supplier=Element14, ComponentLink7URL=https://datasheet.ciiva.com/1195/1868820-1195468.pdf?src-supplier=Element14, ComponentLink8Description=https://datasheet.ciiva.com/17179/bc546-17179703.pdf?src-supplier=Future+Electronics, ComponentLink8URL=https://datasheet.ciiva.com/17179/bc546-17179703.pdf?src-supplier=Future+Electronics, Item Type=BJTs, Lead Free=5697LeadFree, Manufacturer Part Number=BC547BTA, Pricing="2000=0.041, 8000=0.0391, 20000=0.0379, 50000=0.0368, 80000=0.0351 (USD)", RoHS=Yes, Stock=10000, Supplier="Future Electronics"
Q3: "40V 100mW 100@10mA,1V 200mA 300MHz 300mV@50mA,5mA NPN -55℃~+150℃@(Tj) SOT-723 Bipolar Transistors - BJT ROHS", LCSC Part Number=C2923360, Manufacturer="TECH PUBLIC", Package=SOT-723, ComponentLink1Description=LCSC, ComponentLink1URL=https://www.lcsc.com/product-detail/Bipolar-Transistors-BJT_TECH-PUBLIC-MMBT3904M_C2923360.html, Item Type=Mosfet, Manufacturer Part Number=MMBT3904M
Q5 Q6: "30V 5.8A 32mΩ@10V,5.8A 1.4W 1.4V@250uA N Channel SOT-23 MOSFETs ROHS", LCSC Part Number=C344010, Manufacturer=BORN, ComponentLink1Description=LCSC, ComponentLink1URL=https://www.lcsc.com/product-detail/MOSFETs_BORN-AO3400A_C344010.html, Item Type=Mosfet, Manufacturer Part Number=AO3400A
R1 R2 R3 R15 R24 R25: library part RC0402FR-0710KL, "RES 10K OHM 1% 1/16W 0402", Case Code (Imperial)=0402, Case Code (Metric)=1005, LCSC Part Number=C60490, Manufacturer=Yageo, Max Operating Temperature=155°C, Max Power Dissipation=63mW, Min Operating Temperature=-55°C, Power Rating=62.5mW, Resistance=10kR, Resistance Tolerance=1%, Resistor Type="Thick Film", Supplier Part Number 1=603-RC0402FR-0710KL, Temperature Coefficient=100ppm/°C, Voltage Rating=50V, Case/Package=0402, Category="Chip SMD Resistors", ComponentLink1Description=https://datasheet.ciiva.com/7660/38568-7660787.pdf?src-supplier=Element14, ComponentLink1URL=https://datasheet.ciiva.com/7660/38568-7660787.pdf?src-supplier=Element14, ComponentLink2Description=https://datasheet.ciiva.com/7849/1686128-7849814.pdf?src-supplier=Element14, ComponentLink2URL=https://datasheet.ciiva.com/7849/1686128-7849814.pdf?src-supplier=Element14, ComponentLink3Description=https://datasheet.ciiva.com/7983/1018594-7983486.pdf?src-supplier=Element14, ComponentLink3URL=https://datasheet.ciiva.com/7983/1018594-7983486.pdf?src-supplier=Element14, ComponentLink4Description=https://datasheet.ciiva.com/22747/1018594-22747512.pdf?src-supplier=Element14, ComponentLink4URL=https://datasheet.ciiva.com/22747/1018594-22747512.pdf?src-supplier=Element14, ComponentLink5Description=https://datasheet.ciiva.com/12667/pyu-rc0402-51-rohs-l-6-r-12667067.pdf?src-supplier=Mouser, ComponentLink5URL=https://datasheet.ciiva.com/12667/pyu-rc0402-51-rohs-l-6-r-12667067.pdf?src-supplier=Mouser, ComponentLink6Description=https://datasheet.ciiva.com/7849/1784430-7849813.pdf?src-supplier=Element14, ComponentLink6URL=https://datasheet.ciiva.com/7849/1784430-7849813.pdf?src-supplier=Element14, ComponentLink7Description=https://datasheet.ciiva.com/7849/1784430-7849815.pdf?src-supplier=Element14, ComponentLink7URL=https://datasheet.ciiva.com/7849/1784430-7849815.pdf?src-supplier=Element14, Construction=Rectangular, Depth=0.5mm, Features="Moisture Resistant", Height=0.32mm, Item Type=Resistor, Lead Free="Lead Free", Lead Pitch=0.2mm, Length=1mm, Manufacturer Part Number=RC0402FR-0710KL, Military Standard=Not, Number of Pins=2, Number of Terminations=2, Packaging="Tape and Reel", Pricing 1="1=0.10000, 10=0.01400, 50=0.01400, 100=0.00500, 1000=0.00300, 10000=0.00200 (USD)", REACH SVHC="No SVHC", RoHS=Yes, RoHS Compliant=Yes, Series=RC, Stock 1=18648329, Supplier 1=Mouser, Termination=SMD/SMT, Tolerance=1%, Voltage Rating (DC)=50V, Width=0.5mm, Working Voltage=50V
R4 R16 R17: library part RC0402FR-072K2L, "RES SMD 2.2K OHM 1% 1/16W 0402", Case Code (Imperial)=0402, Case Code (Metric)=1005, LCSC Part Number=C114762, Manufacturer=Yageo, Max Operating Temperature=155°C, Max Power Dissipation=63mW, Min Operating Temperature=-55°C, Resistance=2.2kR, Resistance Tolerance=1%, Resistor Type="Thick Film", Supplier Part Number 1=311-2.20KLRCT-ND, Temperature Coefficient=100ppm/°C, Voltage Rating=50V, Case/Package=0402, ComponentLink1Description=http://www.farnell.com/datasheets/2167052.pdf?src-supplier=Element14, ComponentLink1URL=http://www.farnell.com/datasheets/2167052.pdf?src-supplier=Element14, ComponentLink2Description=http://www.yageo.com/documents/recent/PYu-RC_Group_51_RoHS_L_9.pdf?src-supplier=Mouser, ComponentLink2URL=http://www.yageo.com/documents/recent/PYu-RC_Group_51_RoHS_L_9.pdf?src-supplier=Mouser, ComponentLink3Description=http://documents.rs-components.com/techlib://itc_doclist_GB.htm?stockno=6186532&src-supplier=RSComponents, ComponentLink3URL=http://documents.rs-components.com/techlib://itc_doclist_GB.htm?stockno=6186532&src-supplier=RSComponents, ComponentLink4Description=http://www.yageo.com/documents/recent/PYu-RC0402_51_RoHS_L_6_r.pdf?src-supplier=Future+Electronics, ComponentLink4URL=http://www.yageo.com/documents/recent/PYu-RC0402_51_RoHS_L_6_r.pdf?src-supplier=Future+Electronics, Construction=Rectangular, Depth=0.5mm, Features="Moisture Resistant", Height=0.35mm, Lead Free="Lead Free", Length=1mm, Manufacturer Part Number=RC0402FR-072K2L, Military Standard=Not, Number of Terminations=2, Packaging="Tape and Reel", Power Rating=63mW, Pricing 1="1=0.1, 10=0.016, 100=0.0066, 1000=0.00299, 2500=0.00259, 5000=0.00214 (USD)", REACH SVHC=Unknown, RoHS Compliant=Yes, Series=RC, Size Code=0402, Stock 1=966157, Supplier 1=Digi-Key, Technology="THICK FILM", Termination=SMD/SMT, Tolerance=1%, Weight=2.3E-05oz, Width=0.5mm
R5 R7 R10: library part RC0402FR-071KL, "RES 1K OHM 1% 1/16W 0402", Case Code (Imperial)=0402, Case Code (Metric)=1005, LCSC Part Number=C106235, Manufacturer=Yageo, Max Operating Temperature=155°C, Max Power Dissipation=63mW, Min Operating Temperature=-55°C, Power Rating=62.5mW, Resistance=1kR, Resistance Tolerance=1%, Resistor Type="Thick Film", Temperature Coefficient=100ppm/°C, Voltage Rating=50V, Case/Package=0402, Category="Chip SMD Resistors", ComponentLink1Description=https://datasheet.ciiva.com/11819/0900766b80c66297-11819477.pdf?src-supplier=RSComponents, ComponentLink1URL=https://datasheet.ciiva.com/11819/0900766b80c66297-11819477.pdf?src-supplier=RSComponents, ComponentLink2Description=https://datasheet.ciiva.com/7983/1018594-7983502.pdf?src-supplier=Element14, ComponentLink2URL=https://datasheet.ciiva.com/7983/1018594-7983502.pdf?src-supplier=Element14, ComponentLink3Description=https://datasheet.ciiva.com/22747/1018594-22747513.pdf?src-supplier=Element14, ComponentLink3URL=https://datasheet.ciiva.com/22747/1018594-22747513.pdf?src-supplier=Element14, ComponentLink4Description=https://datasheet.ciiva.com/12666/pyu-rc0402-51-rohs-l-6-r-12666741.pdf?src-supplier=Mouser, ComponentLink4URL=https://datasheet.ciiva.com/12666/pyu-rc0402-51-rohs-l-6-r-12666741.pdf?src-supplier=Mouser, ComponentLink5Description=https://datasheet.ciiva.com/7849/1018594-7849869.pdf?src-supplier=Element14, ComponentLink5URL=https://datasheet.ciiva.com/7849/1018594-7849869.pdf?src-supplier=Element14, ComponentLink6Description=https://datasheet.ciiva.com/7849/1018594-7849871.pdf?src-supplier=Element14, ComponentLink6URL=https://datasheet.ciiva.com/7849/1018594-7849871.pdf?src-supplier=Element14, ComponentLink7Description=https://datasheet.ciiva.com/17063/pyu-rc0402-51-rohs-l-6-r-17063193.pdf?src-supplier=Future+Electronics, ComponentLink7URL=https://datasheet.ciiva.com/17063/pyu-rc0402-51-rohs-l-6-r-17063193.pdf?src-supplier=Future+Electronics, Construction=Rectangular, Depth=0.5mm, Features="Moisture Resistant", Height=0.32mm, Item Type=Resistor, Lead Free="Lead Free", Length=1mm, Manufacturer Part Number=RC0402FR-071KL, Military Standard=Not, Number of Pins=2, Number of Terminations=2, Packaging="Tape and Reel", Pricing 1="10000=0.00085, 20000=0.00087, 40000=0.00084, 60000=0.00083, 80000=0.00079, 100000=0.00078, 1000000=0.00076 (USD)", Reach SVHC Compliant=Yes, RoHS=Yes, RoHS Compliant=Yes, Series=RC, Size Code=0402, Stock 1=13030000, Supplier 1=Avnet, Supplier Part Number 1=RC0402FR-071KL, Technology="THICK FILM", Termination=SMD/SMT, Tolerance=1%, Voltage Rating (DC)=50V, Width=0.5mm
R6: library part RC0402FR-0747KL, "RES 47K OHM 1% 1/16W 0402", Case Code (Imperial)=0402, Case Code (Metric)=1005, LCSC Part Number=C93943, Manufacturer=Yageo, Max Operating Temperature=155°C, Max Power Dissipation=63mW, Min Operating Temperature=-55°C, Package Quantity=1, Power Rating=62.5mW, Resistance=47kR, Resistance Tolerance=1%, Resistor Type="Thick Film", Temperature Coefficient=100ppm/°C, Voltage Rating=50V, Case/Package=0402, Category="Chip SMD Resistors", ComponentLink1Description=https://datasheet.ciiva.com/46412/1018594-46412839.pdf?src-supplier=Element14, ComponentLink1URL=https://datasheet.ciiva.com/46412/1018594-46412839.pdf?src-supplier=Element14, ComponentLink2Description=https://datasheet.ciiva.com/2453/pyu-r-int-thick-7-2453389.pdf?src-supplier=Digi-Key, ComponentLink2URL=https://datasheet.ciiva.com/2453/pyu-r-int-thick-7-2453389.pdf?src-supplier=Digi-Key, ComponentLink3Description=https://datasheet.ciiva.com/2453/pyu-r-int-thick-7-2453390.pdf?src-supplier=Digi-Key, ComponentLink3URL=https://datasheet.ciiva.com/2453/pyu-r-int-thick-7-2453390.pdf?src-supplier=Digi-Key, ComponentLink4Description=https://datasheet.ciiva.com/2453/pyu-r-int-thick-7-2453388.pdf?src-supplier=Digi-Key, ComponentLink4URL=https://datasheet.ciiva.com/2453/pyu-r-int-thick-7-2453388.pdf?src-supplier=Digi-Key, ComponentLink5Description=https://datasheet.ciiva.com/15189/getdatasheetpartid-323748-15189466.pdf?src-supplier=Verical, ComponentLink5URL=https://datasheet.ciiva.com/15189/getdatasheetpartid-323748-15189466.pdf?src-supplier=Verical, ComponentLink6Description=https://datasheet.ciiva.com/16793/pyu-rc0402-51-rohs-l-6-r-16793430.pdf?src-supplier=Future+Electronics, ComponentLink6URL=https://datasheet.ciiva.com/16793/pyu-rc0402-51-rohs-l-6-r-16793430.pdf?src-supplier=Future+Electronics, Construction=Rectangular, Depth=0.5mm, Features="Moisture Resistant", Height=0.016inch, Item Type=Resistor, Lead Free="Lead Free", Length=1mm, Manufacturer Part Number=RC0402FR-0747KL, Military Standard=Not, Number of Terminations=2, Packaging="Tape and Reel", Pricing 1="10000=0.00085, 20000=0.00087, 40000=0.00084, 60000=0.00083, 80000=0.00079, 100000=0.00078, 1000000=0.00076 (USD)", RoHS=Yes, RoHS Compliant=Yes, Series=RC, Size Code=0402, Stock 1=680000, Supplier 1=Avnet, Supplier Part Number 1=RC0402FR-0747KL, Termination=SMD/SMT, Tolerance=1%, Width=0.02inch
R8: library part RC0402FR-074K7L, "RES 4.7K OHM 1% 1/16W 0402", Case Code (Imperial)=0402, Case Code (Metric)=1005, LCSC Part Number=C105871, Manufacturer=Yageo, Max Operating Temperature=155°C, Max Power Dissipation=63mW, Min Operating Temperature=-55°C, Power Rating=62.5mW, Resistance=4.7kR, Resistance Tolerance=1%, Resistor Type="Thick Film", Temperature Coefficient=100ppm/°C, Voltage Rating=50V, Case/Package=0402, Category="Chip SMD Resistors", ComponentLink1Description=https://datasheet.ciiva.com/22661/1686128-22661342.pdf?src-supplier=Element14, ComponentLink1URL=https://datasheet.ciiva.com/22661/1686128-22661342.pdf?src-supplier=Element14, ComponentLink2Description=https://datasheet.ciiva.com/7850/1018594-7850022.pdf?src-supplier=Element14, ComponentLink2URL=https://datasheet.ciiva.com/7850/1018594-7850022.pdf?src-supplier=Element14, ComponentLink3Description=https://datasheet.ciiva.com/7850/1018594-7850023.pdf?src-supplier=Element14, ComponentLink3URL=https://datasheet.ciiva.com/7850/1018594-7850023.pdf?src-supplier=Element14, ComponentLink4Description=https://datasheet.ciiva.com/15215/getdatasheetpartid-328119-15215035.pdf?src-supplier=Verical, ComponentLink4URL=https://datasheet.ciiva.com/15215/getdatasheetpartid-328119-15215035.pdf?src-supplier=Verical, Construction=Rectangular, Depth=0.5mm, Features="Moisture Resistant", Height=0.32mm, Height - Seated (Max)=0.016inch, Item Type=Resistor, Lead Free="Lead Free", Length=1mm, Manufacturer Part Number=RC0402FR-074K7L, Military Standard=Not, Number of Pins=2, Number of Terminations=2, Packaging="Tape and Reel", Pricing 1="10000=0.00085 (USD)", Reach SVHC Compliant=Yes, RoHS=Yes, RoHS Compliant=Yes, Series=RC, Size Code=0402, Stock 1=2420000, Supplier 1=Avnet, Supplier Part Number 1=RC0402FR-074K7L, Termination=SMD/SMT, Tolerance=1%, Voltage Rating (DC)=50V, Width=0.5mm
R9: library part RC0402FR-0718KL, "RES 18K OHM 1% 1/16W 0402", Case Code (Imperial)=0402, Case Code (Metric)=1005, LCSC Part Number=C138044, Manufacturer=Yageo, Max Operating Temperature=155°C, Max Power Dissipation=63mW, Min Operating Temperature=-55°C, Package Quantity=1, Resistance=18kR, Resistance Tolerance=1%, Resistor Type="Thick Film", Supplier Part Number 1=603-RC0402FR-0718KL, Temperature Coefficient=100ppm/°C, Voltage Rating=50V, Case/Package=0402, Category="Chip SMD Resistors", ComponentLink1Description=https://datasheet.ciiva.com/11808/0900766b80c66297-11808760.pdf?src-supplier=RSComponents, ComponentLink1URL=https://datasheet.ciiva.com/11808/0900766b80c66297-11808760.pdf?src-supplier=RSComponents, ComponentLink2Description=https://datasheet.ciiva.com/2453/pyu-r-int-thick-7-2453605.pdf?src-supplier=Digi-Key, ComponentLink2URL=https://datasheet.ciiva.com/2453/pyu-r-int-thick-7-2453605.pdf?src-supplier=Digi-Key, ComponentLink3Description=https://datasheet.ciiva.com/2453/pyu-r-int-thick-7-2453606.pdf?src-supplier=Digi-Key, ComponentLink3URL=https://datasheet.ciiva.com/2453/pyu-r-int-thick-7-2453606.pdf?src-supplier=Digi-Key, ComponentLink4Description=https://datasheet.ciiva.com/2453/pyu-r-int-thick-7-2453604.pdf?src-supplier=Digi-Key, ComponentLink4URL=https://datasheet.ciiva.com/2453/pyu-r-int-thick-7-2453604.pdf?src-supplier=Digi-Key, ComponentLink5Description=https://datasheet.ciiva.com/5558/pyu-rc0402-51-rohs-l-6-r-8721-5558222.pdf?src-supplier=Mouser, ComponentLink5URL=https://datasheet.ciiva.com/5558/pyu-rc0402-51-rohs-l-6-r-8721-5558222.pdf?src-supplier=Mouser, ComponentLink6Description=https://datasheet.ciiva.com/7849/1018594-7849855.pdf?src-supplier=Element14, ComponentLink6URL=https://datasheet.ciiva.com/7849/1018594-7849855.pdf?src-supplier=Element14, ComponentLink7Description=https://datasheet.ciiva.com/16741/pyu-rc0402-51-rohs-l-6-r-16741882.pdf?src-supplier=Future+Electronics, ComponentLink7URL=https://datasheet.ciiva.com/16741/pyu-rc0402-51-rohs-l-6-r-16741882.pdf?src-supplier=Future+Electronics, Construction=Rectangular, Depth=0.5mm, Features="Moisture Resistant", Height=0.016inch, Lead Free="Lead Free", Length=1mm, Manufacturer Part Number=RC0402FR-0718KL, Military Standard=Not, Number of Terminations=2, Packaging="Tape and Reel", Power Rating=63mW, Pricing 1="1=0.10000, 10=0.01200, 50=0.01200, 100=0.00500, 1000=0.00300, 2500=0.00200, 10000=0.00100 (USD)", REACH SVHC=Unknown, RoHS=Yes, RoHS Compliant=Yes, Series=RC, Size Code=0402, Stock 1=484741, Supplier 1=Mouser, Technology="THICK FILM", Termination=SMD/SMT, Tolerance=1%, Width=0.02inch
R11 R20 R21 R22: library part RC0402FR-070RL, "RES 0 OHM JUMPER 1/16W 0402", Case Code (Imperial)=0402, Case Code (Metric)=1005, LCSC Part Number=C106231, Manufacturer=Yageo, Max Operating Temperature=155°C, Max Power Dissipation=63mW, Min Operating Temperature=-55°C, Power Rating=62.5mW, Resistor Type="Thick Film", Supplier Part Number 1=603-RC0402FR-070RL, Temperature Coefficient=200ppm/°C, Tolerance=1%, Voltage Rating=50V, Case/Package=0402, ComponentLink1Description=https://datasheet.ciiva.com/8896/pyu-rc0402-51-rohs-l-6-8896149.pdf?src-supplier=Avnet, ComponentLink1URL=https://datasheet.ciiva.com/8896/pyu-rc0402-51-rohs-l-6-8896149.pdf?src-supplier=Avnet, ComponentLink2Description=https://datasheet.ciiva.com/16790/pyu-rc0402-51-rohs-l-6-r-16790444.pdf?src-supplier=Future+Electronics, ComponentLink2URL=https://datasheet.ciiva.com/16790/pyu-rc0402-51-rohs-l-6-r-16790444.pdf?src-supplier=Future+Electronics, Contact Plating=Tin,Matte, Features="Moisture Resistant", Height=0.35mm, Item Type=Resistors, Lead Free="Lead Free", Length=1mm, Manufacturer Part Number=RC0402FR-070RL, Mount="Surface Mount", Number of Terminations=2, Packaging="Tape and Reel", Pricing 1="1=0.10000, 10=0.01400, 50=0.01400, 100=0.00600, 1000=0.00300, 5000=0.00200, 10000=0.00100 (USD)", Radiation Hardening=No, Resistance=0R, RoHS=Yes, RoHS Compliant=Yes, Series=RC, Size Code=0402, Stock 1=8556842, Supplier 1=Mouser, Termination=SMD/SMT, Width=0.5mm